# Altium PCB MiniDisplay.PcbDoc (part 2 of 2)
Units mil, origin at the board's own origin, x right, y up, seen from the top; angles counter-clockwise.
Board outline 1690.11 x 1520.11 mil, 2 copper layers (Top1, Bottom2), stack 12.8 mil thick; 78 components, 93 nets, 423 pads, 283 vias.
Unrouted connection lines stored in the file: 98.
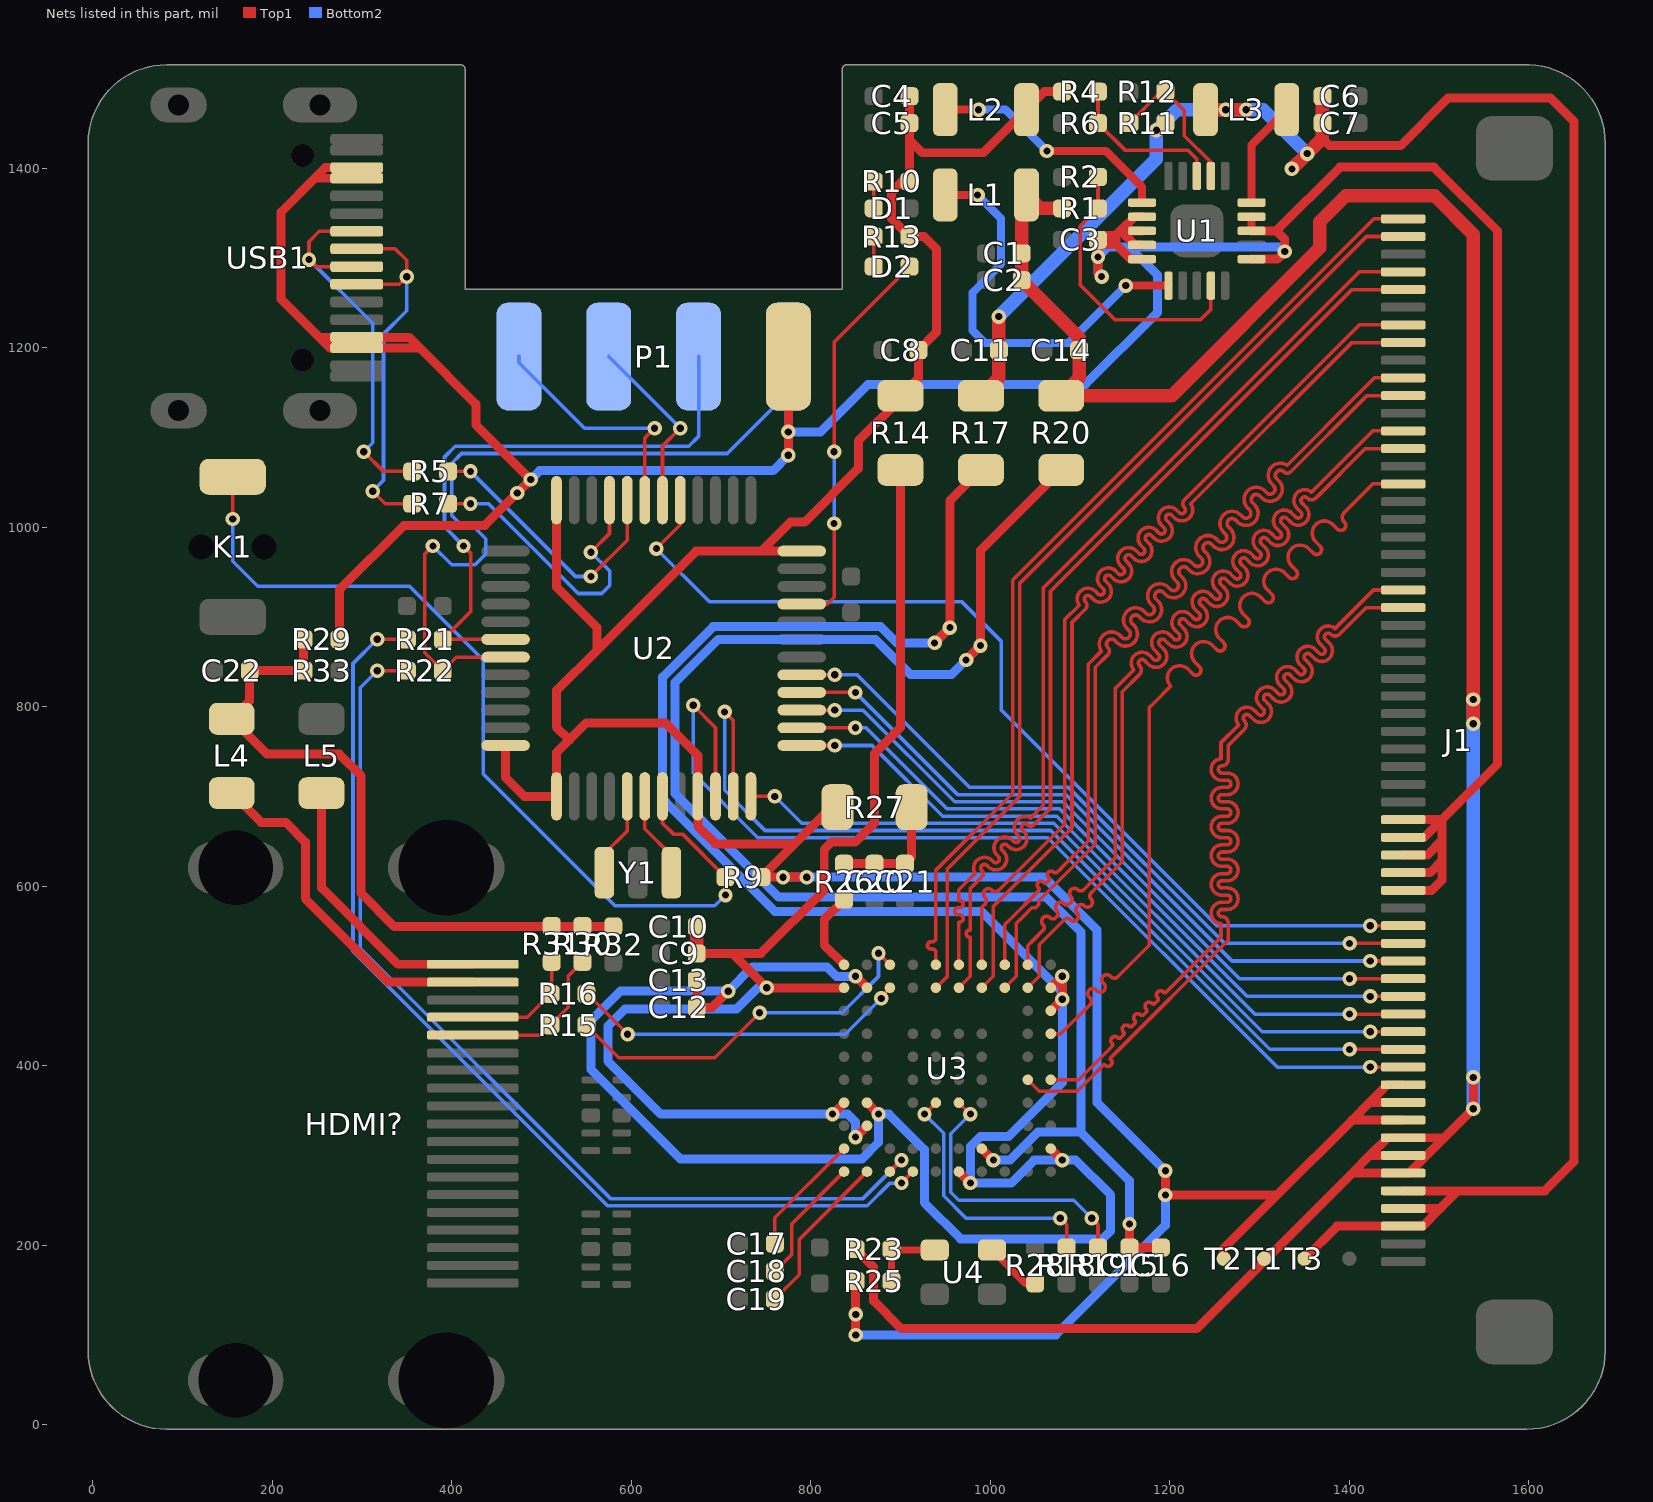
[diagram p2: the nets of this part, all layers, seen from the top]

## Via types
v1: diameter 16, hole 8, Top1 to Bottom2, tented both sides, 283 vias

## Nets (pads, with @x,y where several pads share a name; then routed paths per layer and width w, separated by ;. In a path a pad name is that pad's centre, name@x,y a point inside that pad or via, vN(x,y) a via of type N, cw(c..) or ccw(c..) an arc to the next point about the centre after c; other vN are vias at no path point) (continued)
MIPI0_D3_P: J1.45 U3.D10 | length 1077.2
  Top1 w4: U3.D10@1067.36,435.59 1078.59,435.59 1111,468 ccw(c1107.11,471.89) 1111,475.78 1110.29,476.49 cw(c1114.18,480.37) 1110.29,484.26 cw(c1114.18,480.37) 1118.07,484.26 1118.78,483.56 ccw(c1122.67,487.45) 1126.56,483.56 ccw(c1122.67,487.45) 1126.56,491.33 1125.85,492.04 cw(c1129.74,495.93) 1125.85,499.82 cw(c1129.74,495.93) 1133.63,499.82 1134.33,499.11 ccw(c1138.22,503) 1142.11,499.11 1146,503 1152.5,509.5 1177,534 1177,799 1181.34,803.34 1200.9,822.9 cw(c1210.79,832.08) 1220.33,841.63 1225.28,836.68 ccw(c1229.17,840.57) 1233.05,836.66 ; 1233.06,836.68 ccw(c1229.17,840.57) 1234.67,840.57 ccw(c1229.17,840.57) 1233.06,844.46 1228.11,849.41 cw(c1237.66,858.95) 1247.2,868.5 1252.15,863.55 ccw(c1256.04,867.44) 1259.92,863.53 ; 1259.93,863.55 ccw(c1256.04,867.44) 1261.54,867.44 ccw(c1256.04,867.44) 1259.93,871.33 1254.98,876.28 cw(c1264.53,885.82) 1274.07,895.37 1279.02,890.42 ccw(c1282.91,894.31) 1286.79,890.4 ; 1286.8,890.42 ccw(c1282.91,894.31) 1288.41,894.31 ccw(c1282.91,894.31) 1286.8,898.2 1281.85,903.15 cw(c1291.4,912.69) 1300.94,922.24 1305.89,917.29 ccw(c1309.78,921.18) 1313.66,917.27 ccw(c1309.78,921.18) 1315.28,921.18 ccw(c1309.78,921.18) 1313.67,925.07 1308.72,930.02 cw(c1318.27,939.56) 1327.81,949.11 1332.76,944.16 ccw(c1336.65,948.05) 1340.53,944.14 ; 1340.54,944.16 ccw(c1336.65,948.05) 1342.15,948.05 ccw(c1336.65,948.05) 1340.54,951.94 1335.59,956.89 cw(c1345.14,966.43) 1354.68,975.98 1359.63,971.03 ccw(c1363.52,974.92) 1367.4,971.01 ; 1367.41,971.03 ccw(c1363.52,974.92) 1369.02,974.92 ccw(c1363.52,974.92) 1367.41,978.81 1362.46,983.76 cw(c1372.01,993.3) 1381.55,1002.85 1386.5,997.9 ccw(c1390.39,1001.79) 1394.27,997.88 ; 1394.28,997.9 ccw(c1390.39,1001.79) 1395.89,1001.79 ccw(c1390.39,1001.79) 1394.28,1005.68 cw(c1399.59,1010.98) 1394.28,1016.28 1412.04,1034.04 1426.07,1048.07 J1.45@1460,1048.07
MIPI0_DC_N: J1.38 U3.F9 | length 1078.1
  Top1 w4: U3.F9@1041.77,384.41 1054.57,371.61 1096.93,371.61 1117.31,392 1120.5,395.18 1125.8,400.49 cw(c1126.86,399.42) 1127.92,400.49 ccw(c1131.1,403.67) 1134.28,400.49 ccw(c1131.1,403.67) 1134.28,406.85 cw(c1135.35,407.91) 1134.28,408.97 1136.66,411.34 1265,539.69 1265,559 ccw(c1258,559) 1258,566 cw(c1258,570) 1258,574 1264,574 ccw(c1264,586) 1276,586 ccw(c1264,586) 1264,598 1258,598 cw(c1258,602) 1258,606 1264,606 ccw(c1264,618) 1276,618 ccw(c1264,618) 1264,630 1258,630 cw(c1258,634) 1258,638 1264,638 ccw(c1264,650) 1276,650 ccw(c1264,650) 1264,662 1258,662 cw(c1258,666) 1258,670 1264,670 ccw(c1264,682) 1276,682 ccw(c1264,682) 1264,694 1258,694 cw(c1258,698) 1258,702 1264,702 ccw(c1264,714) 1276,714 ccw(c1264,714) 1264,726 1258,726 cw(c1258,730) 1258,734 ccw(c1258,741) 1265,741 1265,756.69 1282.92,774.61 ccw(c1277.97,779.56) 1284.97,779.56 ccw(c1277.97,779.56) 1282.92,784.51 cw(c1285.75,787.33) 1288.58,790.16 1292.82,785.92 ccw(c1301.3,794.41) 1313.3,794.41 ccw(c1301.3,794.41) 1309.79,802.89 1305.55,807.13 cw(c1308.38,809.96) 1311.2,812.79 1315.45,808.55 ccw(c1323.93,817.03) 1335.93,817.03 ccw(c1323.93,817.03) 1332.42,825.52 1328.17,829.76 cw(c1331,832.59) 1333.83,835.42 1338.07,831.18 ccw(c1346.56,839.66) 1358.56,839.66 ccw(c1346.56,839.66) 1355.05,848.15 1350.8,852.39 cw(c1353.63,855.22) 1356.46,858.05 1360.7,853.8 ccw(c1369.19,862.29) 1381.19,862.29 ccw(c1369.19,862.29) 1377.67,870.77 1373.43,875.02 cw(c1376.26,877.84) 1379.09,880.67 ccw(c1384.04,885.62) 1388.99,880.67 1418.59,910.28 J1.38@1460,910.28
MIPI0_DC_P: J1.39 U3.F10 | length 1080.8
  Top1 w4: U3.F10@1067.36,384.41 1098.41,384.41 1134,420 1135.52,421.52 ccw(c1133.86,423.18) 1135.52,424.84 ; 1135.52,424.84 cw(c1138.7,428.03) 1135.52,431.21 cw(c1138.7,428.03) 1141.88,431.21 ccw(c1143.55,432.87) 1145.21,431.21 1148.25,434.25 ccw(c1146.59,435.91) 1148.25,437.57 cw(c1151.43,440.75) 1148.25,443.94 cw(c1151.43,440.75) 1154.61,443.94 ccw(c1156.27,445.6) 1157.94,443.94 1160.98,446.98 ccw(c1159.31,448.64) 1160.98,450.3 cw(c1164.16,453.48) 1160.98,456.66 cw(c1164.16,453.48) 1167.34,456.66 ccw(c1169,458.33) 1170.66,456.66 1173.7,459.7 ccw(c1172.04,461.37) 1173.7,463.03 cw(c1176.89,466.21) 1173.7,469.39 cw(c1176.89,466.21) 1180.07,469.39 ccw(c1181.73,471.05) 1183.39,469.39 1186.43,472.43 ccw(c1184.77,474.09) 1186.43,475.76 cw(c1189.61,478.94) 1186.43,482.12 cw(c1189.61,478.94) 1192.8,482.12 ccw(c1194.46,483.78) 1196.12,482.12 1199.5,485.5 1257,543 1257,558.04 cw(c1258,570) 1258,582 1264,582 ccw(c1264,586) 1268,586 ccw(c1264,586) 1264,590 1258,590 cw(c1258,602) 1258,614 1264,614 ccw(c1264,618) 1268,618 ccw(c1264,618) 1264,622 1258,622 cw(c1258,634) 1258,646 1264,646 ccw(c1264,650) 1268,650 ccw(c1264,650) 1264,654 1258,654 cw(c1258,666) 1258,678 1264,678 ccw(c1264,682) 1268,682 ccw(c1264,682) 1264,686 1258,686 cw(c1258,698) 1258,710 1264,710 ccw(c1264,714) 1268,714 ccw(c1264,714) 1264,718 1258,718 cw(c1258,730) 1257,741.96 1257,760 1276.59,779.59 cw(c1285.75,787.33) 1294.23,795.82 1298.48,791.58 ccw(c1301.3,794.41) 1305.3,794.41 ccw(c1301.3,794.41) 1304.13,797.23 1299.89,801.48 cw(c1308.38,809.96) 1316.86,818.45 1321.1,814.2 ccw(c1323.93,817.03) 1327.93,817.03 ccw(c1323.93,817.03) 1326.77,819.85 1322.52,824.1 cw(c1331,832.59) 1339.49,841.07 1343.73,836.83 ccw(c1346.56,839.66) 1350.56,839.66 ccw(c1346.56,839.66) 1349.39,842.49 1345.15,846.73 cw(c1353.63,855.22) 1362.12,863.7 1366.36,859.46 ccw(c1369.19,862.29) 1373.19,862.29 ccw(c1369.19,862.29) 1372.02,865.12 1367.77,869.36 cw(c1376.26,877.84) 1384.01,887.01 1426.96,929.96 J1.39@1460,929.96
MIPI1_D0_N: J1.47 U3.B9 | length 1076.2
  Top1 w4: U3.B9@1041.77,486.77 1054.57,499.57 1054.57,512.36 1054.57,534.76 1074,554.2 1077.89,558.09 1082.49,562.68 cw(c1085.67,559.5) 1088.85,562.68 ccw(c1092.74,566.57) 1096.63,562.68 ccw(c1092.74,566.57) 1096.63,570.46 cw(c1099.81,573.64) 1096.63,576.82 1098.04,578.24 cw(c1101.22,575.06) 1104.41,578.24 ccw(c1108.29,582.13) 1112.18,578.24 ccw(c1108.29,582.13) 1112.18,586.02 cw(c1115.37,589.2) 1112.18,592.38 1116.78,596.98 1118.4,598.6 1147,627.2 1147,816.69 1166.19,835.88 ccw(c1161.24,840.83) 1168.24,840.83 ccw(c1161.24,840.83) 1166.19,845.78 cw(c1169.02,848.61) 1171.85,851.44 1176.09,847.19 ccw(c1184.58,855.68) 1196.58,855.68 ccw(c1184.58,855.68) 1193.06,864.16 1188.82,868.41 cw(c1191.65,871.23) 1194.48,874.06 1198.72,869.82 ccw(c1207.2,878.31) 1219.2,878.31 ccw(c1207.2,878.31) 1215.69,886.79 1211.45,891.03 cw(c1214.28,893.86) 1217.1,896.69 1221.35,892.45 ccw(c1229.83,900.93) 1241.83,900.93 ccw(c1229.83,900.93) 1238.32,909.42 1234.07,913.66 cw(c1236.9,916.49) 1239.73,919.32 1243.97,915.07 ccw(c1252.46,923.56) 1264.46,923.56 ccw(c1252.46,923.56) 1260.94,932.05 1256.7,936.29 cw(c1259.53,939.12) 1262.36,941.94 1266.6,937.7 ccw(c1275.09,946.19) 1287.09,946.19 ccw(c1275.09,946.19) 1283.57,954.67 1279.33,958.92 cw(c1282.16,961.74) 1284.99,964.57 1289.23,960.33 ccw(c1297.71,968.81) 1309.71,968.81 ccw(c1297.71,968.81) 1306.2,977.3 1301.96,981.54 cw(c1304.79,984.37) 1307.61,987.2 1311.86,982.96 ccw(c1320.34,991.44) 1332.34,991.44 ccw(c1320.34,991.44) 1328.83,999.93 1324.58,1004.17 cw(c1327.41,1007) 1330.24,1009.83 1334.48,1005.58 ccw(c1342.97,1014.07) 1354.97,1014.07 ccw(c1342.97,1014.07) 1351.45,1022.55 1347.21,1026.8 cw(c1350.04,1029.63) 1352.87,1032.45 ccw(c1357.82,1037.4) 1362.77,1032.45 1417.75,1087.44 J1.47@1460,1087.44
MIPI1_D0_P: J1.48 U3.A9 | length 1076
  Top1 w4: U3.A9@1041.77,512.36 1041.77,533.77 1048.67,540.67 1058,550 1058.71,550.71 ccw(c1055.53,553.89) 1058.71,557.07 cw(c1062.6,560.96) 1058.71,564.85 cw(c1062.6,560.96) 1066.49,564.85 ccw(c1069.67,568.03) 1072.85,564.85 1074.26,566.26 ccw(c1071.08,569.45) 1074.26,572.63 cw(c1078.15,576.52) 1074.26,580.41 cw(c1078.15,576.52) 1082.04,580.41 ccw(c1085.22,583.59) 1088.41,580.41 1089.82,581.82 ccw(c1086.64,585) 1089.82,588.18 cw(c1093.71,592.07) 1089.82,595.96 cw(c1093.71,592.07) 1097.6,595.96 ccw(c1100.78,599.14) 1103.96,595.96 1108.56,600.56 1110,602 1139,631 1139,820 1159.86,840.86 cw(c1169.02,848.61) 1177.51,857.09 1181.75,852.85 ccw(c1184.58,855.68) 1188.58,855.68 ccw(c1184.58,855.68) 1187.41,858.51 1183.16,862.75 cw(c1191.65,871.23) 1200.13,879.72 1204.38,875.48 ccw(c1207.2,878.31) 1211.2,878.31 ccw(c1207.2,878.31) 1210.03,881.13 1205.79,885.38 cw(c1214.28,893.86) 1222.76,902.35 1227,898.1 ccw(c1229.83,900.93) 1233.83,900.93 ccw(c1229.83,900.93) 1232.66,903.76 1228.42,908 cw(c1236.9,916.49) 1245.39,924.97 1249.63,920.73 ccw(c1252.46,923.56) 1256.46,923.56 ccw(c1252.46,923.56) 1255.29,926.39 1251.05,930.63 cw(c1259.53,939.12) 1268.02,947.6 1272.26,943.36 ccw(c1275.09,946.19) 1279.09,946.19 ccw(c1275.09,946.19) 1277.92,949.02 1273.67,953.26 cw(c1282.16,961.74) 1290.64,970.23 1294.89,965.99 ccw(c1297.71,968.81) 1301.71,968.81 ccw(c1297.71,968.81) 1300.54,971.64 1296.3,975.89 cw(c1304.79,984.37) 1313.27,992.86 1317.51,988.61 ccw(c1320.34,991.44) 1324.34,991.44 ccw(c1320.34,991.44) 1323.17,994.27 1318.93,998.51 cw(c1327.41,1007) 1335.9,1015.48 1340.14,1011.24 ccw(c1342.97,1014.07) 1346.97,1014.07 ccw(c1342.97,1014.07) 1345.8,1016.9 1341.55,1021.14 cw(c1350.04,1029.63) 1357.79,1038.79 1412.1,1093.1 1426.13,1107.12 J1.48@1460,1107.12
MIPI1_D1_N: J1.50 U3.B8 | length 1076
  Top1 w4: U3.B8@1016.18,486.77 1028.98,499.57 1028.98,512.36 1028.98,558.66 1034.66,564.34 1038.55,568.23 1046.32,576.01 1050.57,576.01 1054.1,579.55 1054.1,583.79 1061.88,591.57 1068,597.69 1117,646.69 1117,843.95 1131.05,858.01 ; 1131.05,858 ccw(c1127.16,861.89) 1132.66,861.89 ccw(c1127.16,861.89) 1131.05,865.78 cw(c1134.94,869.67) 1131.03,873.54 ; 1131.05,873.56 cw(c1134.94,869.67) 1138.82,873.56 1140.95,871.43 ccw(c1150.49,880.98) 1163.99,880.98 ccw(c1150.49,880.98) 1160.04,890.53 1157.92,892.65 cw(c1161.81,896.54) 1157.9,900.41 ; 1157.92,900.43 cw(c1161.81,896.54) 1165.69,900.43 1167.82,898.31 ccw(c1177.36,907.85) 1190.86,907.85 ccw(c1177.36,907.85) 1186.91,917.4 1184.79,919.52 cw(c1188.68,923.41) 1184.77,927.28 ; 1184.79,927.3 cw(c1188.68,923.41) 1192.56,927.3 1194.69,925.18 ccw(c1204.23,934.72) 1217.73,934.72 ccw(c1204.23,934.72) 1213.78,944.27 1211.66,946.39 cw(c1215.55,950.28) 1211.64,954.15 ; 1211.66,954.17 cw(c1215.55,950.28) 1219.43,954.17 1221.56,952.05 ccw(c1231.1,961.59) 1244.6,961.59 ccw(c1231.1,961.59) 1240.65,971.14 1238.53,973.26 cw(c1242.42,977.15) 1238.51,981.02 cw(c1242.42,977.15) 1246.3,981.04 1248.43,978.92 ccw(c1257.97,988.46) 1271.47,988.46 ccw(c1257.97,988.46) 1267.52,998.01 1265.4,1000.13 cw(c1269.29,1004.02) 1265.38,1007.89 ; 1265.4,1007.91 cw(c1269.29,1004.02) 1273.17,1007.91 1275.3,1005.79 ccw(c1284.84,1015.33) 1298.34,1015.33 ccw(c1284.84,1015.33) 1294.39,1024.88 1292.27,1027 cw(c1296.16,1030.89) 1292.25,1034.76 ; 1292.27,1034.78 cw(c1296.16,1030.89) 1300.04,1034.78 1302.17,1032.66 ccw(c1311.71,1042.2) 1325.21,1042.2 ccw(c1311.71,1042.2) 1321.26,1051.75 1319.14,1053.87 cw(c1323.03,1057.76) 1319.12,1061.63 ; 1319.14,1061.65 cw(c1323.03,1057.76) 1326.91,1061.65 ccw(c1330.8,1065.54) 1334.69,1061.65 1419.54,1146.49 J1.50@1460,1146.49
MIPI1_D1_P: J1.51 U3.A8 | length 1077
  Top1 w4: U3.A8@1016.18,512.36 1016.18,557.18 1023.32,564.32 1052,593 1053.42,594.42 ccw(c1051.3,596.54) 1053.42,598.67 cw(c1056.25,601.49) 1053.42,604.32 cw(c1056.25,601.49) 1059.08,604.32 ccw(c1061.2,606.44) 1063.32,604.32 1064.74,605.74 ccw(c1062.62,607.86) 1064.74,609.98 cw(c1067.57,612.81) 1064.74,615.64 cw(c1067.57,612.81) 1070.39,615.64 ccw(c1072.51,617.76) 1074.64,615.64 1078.17,619.17 1081,622 1109,650 1109,847.27 1123.79,862.05 cw(c1134.94,869.67) 1144.48,879.21 1146.6,877.09 ccw(c1150.49,880.98) 1154.37,877.08 ccw(c1150.49,880.98) 1155.99,880.98 ccw(c1150.49,880.98) 1154.38,884.87 1152.26,886.99 cw(c1161.81,896.54) 1171.35,906.08 1173.47,903.96 ccw(c1177.36,907.85) 1181.24,903.95 ccw(c1177.36,907.85) 1182.86,907.85 ccw(c1177.36,907.85) 1181.25,911.74 1179.13,913.86 cw(c1188.68,923.41) 1198.22,932.95 1200.34,930.83 ccw(c1204.23,934.72) 1208.11,930.82 ccw(c1204.23,934.72) 1209.73,934.72 ccw(c1204.23,934.72) 1208.12,938.61 1206,940.73 cw(c1215.55,950.28) 1225.09,959.82 1227.21,957.7 ccw(c1231.1,961.59) 1234.98,957.69 ; 1234.99,957.7 ccw(c1231.1,961.59) 1236.6,961.59 ccw(c1231.1,961.59) 1234.99,965.48 1232.87,967.6 cw(c1242.42,977.15) 1251.96,986.69 1254.08,984.57 ccw(c1257.97,988.46) 1261.85,984.56 ; 1261.86,984.57 ccw(c1257.97,988.46) 1263.47,988.46 ccw(c1257.97,988.46) 1261.86,992.35 1259.74,994.47 cw(c1269.29,1004.02) 1278.83,1013.56 1280.95,1011.44 ccw(c1284.84,1015.33) 1288.72,1011.43 ccw(c1284.84,1015.33) 1290.34,1015.33 ccw(c1284.84,1015.33) 1288.73,1019.22 1286.61,1021.34 cw(c1296.16,1030.89) 1305.7,1040.43 1307.82,1038.31 ccw(c1311.71,1042.2) 1315.59,1038.3 ccw(c1311.71,1042.2) 1317.21,1042.2 ccw(c1311.71,1042.2) 1315.6,1046.09 1313.48,1048.21 cw(c1323.03,1057.76) 1330.64,1068.91 1413.88,1152.15 1427.91,1166.18 J1.51@1460,1166.18
MIPI1_D2_N: J1.56 U3.B6 | length 1819.6
  Top1 w4: U3.B6@965,486.77 977.8,499.57 977.8,512.36 977.8,539 977.8,542.2 ccw(c977,542.2) 977,543 cw(c977,547) 973,547 cw(c977,547) 977,551 ccw(c977,551.8) 977.8,551.8 977.8,556 977.8,597.48 990.61,610.29 ccw(c987.07,613.83) 992.07,613.83 ccw(c987.07,613.83) 990.61,617.36 cw(c993.43,620.19) 990.59,623.01 ; 990.61,623.02 cw(c993.43,620.19) 996.26,623.02 997.68,621.61 ccw(c1006.16,630.09) 1018.16,630.09 ccw(c1006.16,630.09) 1014.65,638.58 1013.23,639.99 cw(c1016.06,642.82) 1013.22,645.63 ; 1013.23,645.65 cw(c1016.06,642.82) 1018.89,645.65 1020.3,644.23 ccw(c1028.79,652.72) 1040.79,652.72 ccw(c1028.79,652.72) 1037.27,661.2 1035.86,662.62 cw(c1038.69,665.45) 1035.85,668.26 ; 1035.86,668.27 cw(c1038.69,665.45) 1041.52,668.27 ccw(c1045.05,671.81) 1048.59,668.27 ; J1.56@1460,1264.61 1402.97,1264.61 ; 1048.59,668.27 1067,686.69 ; 1048.59,668.27 1067,686.69 ; 1067,686.69 1067,699 ; 1067,686.69 1067,699 ; 1067,699 1067,928.64 ; 1067,699 1067,719 1067,928.64 ; 1067,928.64 1402.97,1264.61 ; 1067,928.64 1402.97,1264.61
MIPI1_D2_P: J1.57 U3.A6 | length 1814.1
  Top1 w4: U3.A6@965,512.36 965,555 965,559.2 cw(c965.8,559.2) 965.8,560 ccw(c965.8,564) 969.8,564 ccw(c965.8,564) 965.8,568 965,568 964.2,568 cw(c964.2,572) 960.2,572 cw(c964.2,572) 964.2,576 965,576 965.8,576 ccw(c965.8,580) 969.8,580 ccw(c965.8,580) 965.8,584 cw(c965.8,584.8) 965,584.8 965,588 965,596 972.14,603.14 983.1,614.1 cw(c993.43,620.19) 1001.92,628.68 1003.33,627.26 ccw(c1006.16,630.09) 1008.98,627.25 ccw(c1006.16,630.09) 1010.16,630.09 ccw(c1006.16,630.09) 1008.99,632.92 1007.58,634.33 cw(c1016.06,642.82) 1024.55,651.3 1025.96,649.89 ccw(c1028.79,652.72) 1031.6,649.88 ccw(c1028.79,652.72) 1032.79,652.72 ccw(c1028.79,652.72) 1031.62,655.55 1030.2,656.96 cw(c1038.69,665.45) 1044.78,675.78 ; 1397.23,1270.34 1059,932.1 ; J1.57@1460,1284.29 1411.19,1284.29 1059,932.1 ; 1044.78,675.78 1059,690 ; 1044.78,675.78 1059,690 ; 1059,690 1059,699 ; 1059,690 1059,699 ; 1059,699 1059,719 ; 1059,699 1059,719 ; 1059,719 1059,721.69 ; 1059,721.69 1059,932.1 ; 1059,721.69 1059,932.1
MIPI1_D3_N: J1.59 U3.B5 | length 1076.6
  Top1 w4: U3.B5@939.41,486.77 952.21,499.57 952.21,619.49 1033,700.28 1033,937.69 1418.97,1323.66 J1.59@1460,1323.66
MIPI1_D3_P: J1.60 U3.A5 | length 1077.7
  Top1 w4: U3.A5@939.41,512.36 939.41,526 ccw(c935.41,526) 935.41,530 934,530 cw(c934,534) 930,534 cw(c934,534) 934,538 935.41,538 ccw(c935.41,542) 939.41,542 939.41,544.5 939.41,618.01 1025,703.6 1025,941 1427.35,1343.35 J1.60@1460,1343.35
MIPI1_DC_N: J1.53 U3.B7 | length 1075.6
  Top1 w4: U3.B7@990.59,486.77 1003.39,499.57 1003.39,577.39 1091,665 1091,893.69 1105.9,908.59 ccw(c1101.66,912.83) 1107.66,912.83 ccw(c1101.66,912.83) 1105.9,917.07 cw(c1108.73,919.9) 1111.56,922.73 1114.38,919.9 ccw(c1122.87,928.38) 1134.87,928.38 ccw(c1122.87,928.38) 1131.36,936.87 1128.53,939.7 cw(c1131.36,942.53) 1134.18,945.36 1137.01,942.53 ccw(c1145.5,951.01) 1157.5,951.01 ccw(c1145.5,951.01) 1153.98,959.5 1151.15,962.33 ; 1151.14,962.34 cw(c1153.98,965.15) 1156.81,967.98 1159.64,965.15 ccw(c1168.12,973.64) 1180.12,973.64 ccw(c1168.12,973.64) 1176.61,982.12 1173.78,984.95 cw(c1176.61,987.78) 1179.44,990.61 1182.27,987.78 ccw(c1190.75,996.27) 1202.75,996.27 ccw(c1190.75,996.27) 1199.24,1004.75 1196.41,1007.58 cw(c1199.24,1010.41) 1202.07,1013.24 1204.89,1010.41 ccw(c1213.38,1018.89) 1225.38,1018.89 ccw(c1213.38,1018.89) 1223.16,1025.85 1402.86,1205.55 J1.53@1460,1205.55
MIPI1_DC_P: J1.54 U3.A7 | length 1077.3
  Top1 w4: U3.A7@990.59,512.36 990.59,576.59 994,580 ccw(c990.11,583.89) 994,587.78 cw(c997.89,591.67) 994,595.56 cw(c997.89,591.67) 1001.78,595.56 ccw(c1005.67,599.45) 1009.56,595.56 1013.45,599.45 1020,606 1083,669 1083,897 1098.95,912.95 cw(c1108.73,919.9) 1117.21,928.38 1120.04,925.56 ccw(c1122.87,928.38) 1126.87,928.38 ccw(c1122.87,928.38) 1125.7,931.21 1122.87,934.04 cw(c1131.36,942.53) 1139.84,951.01 1142.67,948.18 ccw(c1145.5,951.01) 1149.5,951.01 ccw(c1145.5,951.01) 1148.33,953.84 1145.5,956.67 cw(c1153.98,965.15) 1162.47,973.64 1165.3,970.81 ccw(c1168.12,973.64) 1172.12,973.64 ccw(c1168.12,973.64) 1170.97,976.45 1168.12,979.3 cw(c1176.61,987.78) 1185.1,996.27 1187.92,993.44 ccw(c1190.75,996.27) 1194.75,996.27 ccw(c1190.75,996.27) 1193.58,999.1 1190.75,1001.92 cw(c1199.24,1010.41) 1207.72,1018.89 1210.55,1016.07 ccw(c1213.38,1018.89) 1217.38,1018.89 ccw(c1213.38,1018.89) 1216.21,1021.72 cw(c1220.45,1025.97) 1216.21,1030.21 1411.23,1225.23 J1.54@1460,1225.23
NetC9_2: C9.2 C10.2 R14.1 U3.B1 U3.G1 U3.H2 | length 1450.8
  Top1 w10: C9.2@673,525 712.63,525 ; v1(824.25,346.02) U3.G1@837.05,358.82 ; U3.B1@837.05,486.77 v1(750.86,486.77) 712.63,525 ; v1(849.84,320.43) U3.H2@862.64,333.23 ; R14.1@900,1063.66 900,777 871,748 871,670.5 849.5,649 823,649 815,641 815,595.5 744.5,525 712.63,525
  Top1 w15: C9.2@673,525 C10.2@673,555
  Bottom2 w10: v1(750.86,486.77) 740.77,486.77 717,463 593,463 574,444 574,405 632.98,346.02 v1(824.25,346.02) 840.98,346.02 849.84,337.16 v1(849.84,320.43)
NetC12_2: C12.2 C13.2 R17.1 U3.B2 U3.B10 U3.C10 U3.G2 U3.J10 U3.K6 | length 3095.8
  Top1 w10: C13.2@673,495 C12.2@673,465 690,465 v1(708,483) ; v1(849.84,499.57) U3.B2@862.64,486.77 ; U3.G2@862.64,358.82 v1(875.43,346.02) ; v1(938,871) v1(955,888) 955,1029.16 R17.1@989.5,1063.66 ; U3.K6@965,282.05 v1(977.8,269.25) ; U3.J10@1067.36,307.64 v1(1080.16,294.84) ; U3.C10@1067.36,461.18 v1(1080.16,473.98) v1(1080.16,499.57) U3.B10@1067.36,486.77
  Bottom2 w10: v1(849.84,499.57) 828.43,499.57 818,510 735,510 v1(708,483) 588,483 555,450 555,396 655,296 857,296 875.43,314.43 v1(875.43,346.02) 886.98,346.02 926.61,306.39 926.61,247.39 967,207 1125,207 1134,216 1134,256 1095.16,294.84 v1(1080.16,294.84) 1048.84,294.84 1023.25,269.25 v1(977.8,269.25) 977.8,309.8 989,321 1020,321 1080.16,381.16 v1(1080.16,473.98) v1@1080.16,481.84 ; v1(955,888) v1(938,871) 895.8,871 877.8,889 691.2,889 635,832.8 635,697.2 640,692.2 640,692 760,572 990,572 v1@1080.16,481.84 ; v1(1080.16,499.57) v1@1080.16,481.84
NetC15_2: C15.2 C16.2 R20.1 U3.J7 | length 1822.1
  Top1 w10: v1(973,852) v1(989,868) 989,973.66 R20.1@1079,1063.66 ; U3.J7@990.59,307.64 v1(1003.39,294.84) ; v1(1155,223.59) C15.2@1155,197.52 C16.2@1190,197.52
  Bottom2 w10: v1(989,868) v1(973,852) 957,836 911,836 872,875 697,875 649,827 649,703 764,588 1062,588 1101,549 1101,326 ; v1(1003.39,294.84) 1021.84,294.84 1053,326 1101,326 ; v1(1155,223.59) 1155,272 1101,326
NetC17_1: C17.1 U3.J1 | length 137.9
  Top1 w4: C17.1@760,201.61 760,230.59 U3.J1@837.05,307.64
NetC18_1: C18.1 U3.K1 | length 143.2
  Top1 w4: C18.1@760,170.81 779,189.81 779,224 U3.K1@837.05,282.05
NetC19_1: C19.1 U3.K2 | length 184.6
  Top1 w4: C19.1@760,140 787,167 787,206.41 U3.K2@862.64,282.05
NetC20_2: C20.2 C21.2 R26.2 R27.1 | length 126
  Top1 w10: R26.2@837.05,625 C20.2@871.02,625 C21.2@905,625 912.36,632.36 R27.1@912.36,680
NetD1_1: D1.1 R10.2 | length 30
  Top1 w4: D1.1@870,1355 R10.2@870,1385
NetD2_1: D2.1 R13.2 | length 33.5
  Top1 w4: D2.1@870,1290.16 R13.2@870,1323.66
NetHDMI?_18: HDMI?.18 L4.2 | length 392.7
  Top1 w10: L4.2@155,703.66 187.66,671 215,671 237,649 237,586 330,493 HDMI?.18@423.5,493
NetHDMI?_19: HDMI?.19 L5.2 | length 309.4
  Top1 w10: L5.2@255,703.66 255,598 340,513 HDMI?.19@423.5,513
NetK1_1: K1.1 R9.1 U2.7 | length 1026.3
  Top1 w4: v1(156,1009) K1.1@156,1056 ; U2.7@634.84,700 634.84,670.16 647,658 657,658 R9.1@705,610 v1(705,590)
  Bottom2 w4: v1(156,1009) 156,962 184,934 353,934 435,852 435,725 582,578 693,578 v1(705,590)
NetL1_1: L1.1 U1.11 | length 462
  Top1 w9: L1.1@949.72,1370 v1(985.9,1370) ; v1(1150.98,1268.98) U1.11@1198.5,1268.98
  Bottom2 w9: v1(985.9,1370) 1012,1343.9 1012,1293 980,1261 980,1219 994,1205 1087,1205 v1(1150.98,1268.98)
NetL2_1: L2.1 U1.6 | length 272.3
  Top1 w9: L2.1@949.72,1465 v1(987,1465) ; v1(1063,1419) 1128.9,1419 1168.98,1378.92 U1.6@1168.98,1361.5
  Bottom2 w9: v1(987,1465) 1017,1465 v1(1063,1419)
NetL3_1: L3.1 U1.20 | length 119.8
  Top1 w9: U1.20@1291.02,1361.5 1291.02,1425.75 L3.1@1330.28,1465
NetR1_1: R1.1 R2.2 U1.14 | length 321.2
  Top1 w4: R2.2@1120,1390 R1.1@1120,1355 1100,1335 1100,1270 1138.9,1231.1 1234.1,1231.1 1245.75,1242.75 U1.14@1245.75,1268.98
NetR4_1: R4.1 R6.2 U1.3 | length 180.5
  Top1 w4: R4.1@1120,1485 R6.2@1120,1450 1150,1420 1220,1420 1230,1410 U1.3@1230,1391.02
NetR5_2: R5.2 U2.32 | length 309.2
  Top1 w4: R5.2@396,1062 v1(421,1062) ; v1(555,945) 595.47,985.47 U2.32@595.47,1030
  Bottom2 w4: v1(421,1062) 538,945 v1(555,945)
NetR7_2: R7.2 U2.33 | length 337.5
  Top1 w4: R7.2@396,1026 v1(421,1026) ; v1(555,972) 575.79,992.79 U2.33@575.79,1030
  Bottom2 w4: v1(421,1026) 441,1026 541,926 567,926 576,935 576,951 v1(555,972)
NetR11_1: R11.1 R12.2 U1.2 | length 169.5
  Top1 w4: R11.1@1155,1450 1190,1485 R12.2@1195,1485 1216,1464 1216,1436 1245.75,1406.25 U1.2@1245.75,1391.02
NetR15_2: R15.2 U3.A3 | length 421.6
  Top1 w4: R15.2@550,445 586,409 693,409 v1(743,459) ; v1(875.43,525.16) U3.A3@888.23,512.36
  Bottom2 w4: v1(743,459) 835,459 875.43,499.43 v1(875.43,525.16)
NetR16_2: R16.2 U3.B3 | length 381.7
  Top1 w4: R16.2@550,480 551,480 v1(596,435) ; v1@875.43,473.98 U3.B3@888.23,486.77
  Bottom2 w4: v1(596,435) 838.46,435 v1(878.43,474.98)
NetR18_2: R18.2 U3.G5 | length 293.7
  Top1 w4: v1(926.61,346.02) U3.G5@939.41,358.82 ; v1(1078,230) 1085,223 R18.2@1085,197.52
  Bottom2 w4: v1(926.61,346.02) 948,324.64 948,255 973,230 v1(1078,230)
NetR19_2: R19.2 U3.G6 | length 318.5
  Top1 w4: U3.G6@965,358.82 v1(977.8,346.02) ; v1(1113,230) 1120,223 R19.2@1120,197.52
  Bottom2 w4: v1(977.8,346.02) 956,324.23 956,259 965,250 1093,250 v1(1113,230)
NetR21_2: R21.2 U3.K4 | length 1148.7
  Top1 w4: v1(317,875) 349.84,875 R21.2@350,874.84 ; v1(901.02,269.25) U3.K4@913.82,282.05
  Bottom2 w4: v1(317,875) 290,848 290,527.63 573.63,244 863,244 888.25,269.25 v1(901.02,269.25)
NetR22_2: R22.2 U3.K3 | length 1104.3
  Top1 w4: v1(317,840) R22.2@350,840 ; U3.K3@888.23,282.05 v1(901.02,294.84)
  Bottom2 w4: v1(317,840) 298,821 298,530.94 576.94,252 858.18,252 v1(901.02,294.84)
NetR23_1: R23.1 R25.1 U4.4 | length 84.2
  Top1 w8: R25.1@890,160 R23.1@890,195.63 891.02,194.61 U4.4@938.11,194.61
NetR26_1: R26.1 U3.A1 | length 90.9
  Top1 w10: U3.A1@837.05,512.36 815,534.41 815,562.95 R26.1@837.05,585
NetR28_1: R28.1 U4.3 | length 63.5
  Top1 w8: U4.3@1001.89,194.61 1038.98,157.52 R28.1@1050,157.52
NetU2_5: U2.5 Y1.3 | length 95.6
  Top1 w4: Y1.3@570,615 570,636 595.47,661.47 U2.5@595.47,700
NetU2_6: U2.6 Y1.1 | length 97.3
  Top1 w4: U2.6@615.16,700 615.16,663.84 644.8,634.2 Y1.1@644.8,615
PA0: J1.12 U2.10 | length 1113.9
  Top1 w4: v1(669,801.48) 693.9,776.58 U2.10@693.9,700 ; v1(1423.31,398.47) J1.12@1460,398.47
  Bottom2 w4: v1(669,801.48) 669,726 741,654 1064,654 1319.54,398.47 v1(1423.31,398.47)
PA1: J1.13 U2.11 | length 1060.8
  Top1 w4: v1(704,794.08) 713.58,784.5 U2.11@713.58,700 ; v1(1400.26,418.15) J1.13@1460,418.15
  Bottom2 w4: v1(704,794.08) 704,707 749,662 1067.31,662 1311.16,418.15 v1(1400.26,418.15)
PA2: J1.14 U2.12 | length 835.3
  Top1 w4: U2.12@733.27,700 v1(759.84,700) ; v1(1423.31,437.84) J1.14@1460,437.84
  Bottom2 w4: v1(759.84,700) 789.84,670 1070.63,670 1302.79,437.84 v1(1423.31,437.84)
PA3: J1.15 U2.13 | length 793.9
  Top1 w4: U2.13@790,756.73 v1(826.69,756.73) ; v1(1400.26,457.52) J1.15@1460,457.52
  Bottom2 w4: v1(826.69,756.73) 868.27,756.73 947,678 1073.94,678 1294.42,457.52 v1(1400.26,457.52)
PA4: J1.16 U2.14 | length 793.9
  Top1 w4: U2.14@790,776.42 v1(849.74,776.42) ; v1(1423.31,477.2) J1.16@1460,477.2
  Bottom2 w4: v1(849.74,776.42) 861.58,776.42 952,686 1077.25,686 1286.05,477.2 v1(1423.31,477.2)
PA5: J1.17 U2.15 | length 793.9
  Top1 w4: U2.15@790,796.1 v1(826.69,796.1) ; v1(1400.26,496.89) J1.17@1460,496.89
  Bottom2 w4: v1(826.69,796.1) 858.11,796.1 960.21,694 1080.57,694 1277.68,496.89 v1(1400.26,496.89)
PA6: J1.18 U2.16 | length 793.9
  Top1 w4: U2.16@790,815.79 v1(849.74,815.79) ; v1(1423.31,516.57) J1.18@1460,516.57
  Bottom2 w4: v1(849.74,815.79) 963.53,702 1083.88,702 1269.31,516.57 v1(1423.31,516.57)
PA7: J1.19 U2.17 | length 793.9
  Top1 w4: U2.17@790,835.47 v1(826.69,835.47) ; v1(1400.26,536.26) J1.19@1460,536.26
  Bottom2 w4: v1(826.69,835.47) 851.53,835.47 977,710 1087.2,710 1260.94,536.26 v1(1400.26,536.26)
PWM: J1.20 U2.29 | length 1115.8
  Top1 w4: v1(628,976) 654.53,1002.53 U2.29@654.53,1030 ; v1(1423.31,555.94) J1.20@1460,555.94
  Bottom2 w4: v1(628,976) 687,917 968,917 1012,873 1012,796.51 1252.56,555.94 v1(1423.31,555.94)
R_DDC_SCL: HDMI?.15 R15.1 R30.1 | length 176.5
  Top1 w4: HDMI?.15@423.5,434 499,434 R15.1@510,445 530,465 530,499.92 R30.1@545.71,515.63
R_DDC_SDA: HDMI?.16 R16.1 R31.1 | length 133.5
  Top1 w4: HDMI?.16@423.5,454 484,454 R16.1@510,480 511.42,481.42 R31.1@511.42,515.63
R_I2C_SCL: P1.6 R21.1 U2.42 | length 679.5
  Top1 w4: v1(413.21,979) 421,971.21 421,905.84 R21.1@390,874.84 U2.42@460,874.84
  Bottom2 w4: v1(413.21,979) 392,1000.21 392,1078 404,1090 664,1090 675,1101 P1.6@675,1190
R_I2C_SDA: P1.8 R22.1 U2.43 | length 871.5
  Top1 w4: v1(379,979) 370,970 370,860 R22.1@390,840 405.16,855.16 U2.43@460,855.16
  Bottom2 w4: v1(379,979) 400,958 426,958 438,970 438,987 422,1003 410,1003 400,1013 400,1071 411,1082 707,1082 775,1150 P1.8@775,1190
UART1-Rx: P1.2 U2.31 | length 272.7
  Top1 w4: U2.31@615.16,1030 615.16,1099.16 v1(626,1110)
  Bottom2 w4: P1.2@475,1190 475,1183 548,1110 v1(626,1110)
UART1-Tx: P1.4 U2.30 | length 201.1
  Top1 w4: U2.30@634.84,1030 634.84,1090.32 v1(654.53,1110)
  Bottom2 w4: P1.4@575,1190 654.53,1110.47 v1(654.53,1110)
USB_N: R5.1 USB1.A7 USB1.B7 | length 445.1
  Top1 w4: USB1.A7@294.21,1290.16 248.84,1290.16 v1(241,1298) 241,1318 252.53,1329.53 USB1.B7@294.21,1329.53 ; v1(302,1084) 324,1062 R5.1@356,1062
  Bottom2 w4: v1(241,1298) 312,1227 312,1094 v1(302,1084)
USB_P: R7.1 USB1.A6 USB1.B6 | length 442.6
  Top1 w4: USB1.B6@294.21,1270.47 341.47,1270.47 v1(349.84,1278.84) 349.84,1297.13 337.13,1309.84 USB1.A6@294.21,1309.84 ; v1(312,1040) 326,1026 R7.1@356,1026
  Bottom2 w4: v1(312,1040) 324,1052 324,1215 349.84,1240.84 v1(349.84,1278.84)
USR_LED: D2.2 U2.21 | length 442.2
  Top1 w4: U2.21@790,914.21 818.21,914.21 826,922 v1(826,1004) ; v1(826,1084) 826,1206.16 D2.2@910,1290.16
  Bottom2 w4: v1(826,1004) v1(826,1084)
VCC_1V1: C6.2 C7.1 C11.2 J1.3 J1.4 J1.5 L3.2 R11.2 R17.2 T3.0 | length 2674.3
  Top1 w10: T3.0@1350,185 1386.3,221.3 J1.3@1460,221.3 1481.63,221.3 1501.31,240.98 ; 1370,1433 1378,1425 1457,1425 1510,1478 1624,1478 1650,1452 1650,293 1617.67,260.67 1521,260.67 ; J1.4@1460,240.98 1501.31,240.98 ; J1.5@1460,260.67 1521,260.67 ; 1501.31,240.98 1521,260.67
  Top1 w15: R17.2@989.5,1146.34 1009.5,1166.34 C11.2@1009.5,1197.12 v1(1009.5,1234.5) ; v1(1185,1442) 1187,1442 R11.2@1195,1450 ; L3.2@1239.72,1465 v1(1262.36,1465) v1(1285,1465) ; v1(1336,1399) v1(1353,1416) 1370,1433 C7.1@1370,1450 C6.2@1370,1480
  Bottom2 w15: v1(1009.5,1234.5) 1185,1410 v1(1185,1442) 1208,1465 v1(1262.36,1465) v1(1285,1465) 1304,1465 v1(1353,1416) v1(1336,1399)
VCC_1V8: C1.2 C2.1 C14.2 J1.6 J1.7 J1.8 L1.2 R1.2 R20.2 R23.2 T1.0 | length 2958.8
  Top1 w10: R23.2@850,195.63 870,175.63 870,138.02 901.02,107 1229.84,107 1403.2,280.36 ; v1(1538,387) v1(1538,352) 1505.72,319.73 ; 1403.2,280.36 1422.88,300.04 ; 1403.2,280.36 J1.6@1460,280.36 1466.36,280.36 1486.04,300.04 ; 1422.88,300.04 1442.57,319.73 J1.8@1460,319.73 1505.72,319.73 ; 1422.88,300.04 J1.7@1460,300.04 1486.04,300.04 ; 1486.04,300.04 1505.72,319.73
  Top1 w15: R1.2@1080,1355 1055.28,1355 L1.2@1040.28,1370 1035,1364.72 C1.2@1035,1305 C2.1@1035,1275 1099,1211 C14.2@1099,1197.12 1099,1166.34 R20.2@1079,1146.34 1202.31,1146.34 1367,1311.03 1367,1340 1396,1369 1495,1369 1538,1326 v1(1538,808) v1(1538,781)
  Bottom2 w15: v1(1538,352) v1(1538,387) v1(1538,781) v1(1538,808)
VCC_3V3: C4.2 C5.1 C8.2 J1.9 J1.10 J1.11 L2.2 R4.2 R9.2 R10.1 R13.1 R14.2 R25.2 R27.2 T2.0 U2.1 U2.9 U2.24 U2.36 U2.48 | length 3869.6
  Top1 w10: U2.48@460,756.73 460,721 481,700 U2.1@516.73,700 516.73,748.73 531,763 ; U2.36@516.73,1030 516.73,933.27 562,888 562,863 ; U2.24@790,973.27 745,973.27 ; v1(795.44,610) v1(769,610) R9.2@745,610 782,647 ; R27.2@829.68,680 815,680 782,647 ; v1(850,100.05) v1(850,123) R25.2@850,160 ; C4.2@910,1480 C5.1@910,1450 910,1431 ; R4.2@1080,1485 1060.28,1485 L2.2@1040.28,1465 992.28,1417 924,1417 910,1431 ; v1(1195,283) v1(1195,256) 1319.59,256 ; T2.0@1260,185 1260,196.41 1319.59,256 ; J1.9@1460,339.41 1403,339.41 ; J1.10@1460,359.1 1422.69,359.1 ; J1.11@1460,378.78 1442.37,378.78 1422.69,359.1 ; 531,763 550,782 638,782 674.21,745.79 U2.9@674.21,700 674.21,666.84 694.06,647 782,647 ; 531,763 516.73,777.27 516.73,817.73 562,863 ; 562,863 672.27,973.27 745,973.27 ; 745,973.27 777.32,1005.58 793.27,1005.58 853,1065.32 853,1096 900,1143 R14.2@900,1146.34 920,1166.34 C8.2@920,1197.12 940,1217.12 940,1310 926.34,1323.66 R13.1@910,1323.66 890,1343.66 890,1373 902,1385 R10.1@910,1385 910,1431 ; 1319.59,256 1403,339.41 ; 1403,339.41 1422.69,359.1
  Bottom2 w10: v1(769,610) v1(795.44,610) 1060,610 1118.81,551.19 1118.81,359.19 v1(1195,283) v1(1195,256) 1195,222 1073.05,100.05 v1(850,100.05) v1(850,123)
VDD_HDMI_5V: C22.2 L4.1 R29.2 R30.2 R31.2 R32.2 R33.1 | length 754.5
  Top1 w10: R29.2@235,875 R33.1@235,840 C22.2@175,840 175,806.34 L4.1@155,786.34 194.34,747 275,747 299,723 299,592.08 336.08,555 R32.2@580,555
VUSB: C3.2 J1.22 J1.23 J1.24 J1.25 J1.26 P1.7 R29.1 U1.7 U1.8 U1.9 U1.10 U1.16 U1.18 U1.19 USB1.A4 USB1.A9 USB1.B4 USB1.B9 | length 3909.2
  Top1 w9: U1.18@1291.02,1330 U1.19@1291.02,1345.75
  Top1 w10: R29.1@275,875 275,930 347,1002 437,1002 v1(473,1038) v1(488,1053) 427,1114 427,1137 364.39,1199.61 ; USB1.B9@294.21,1388.58 247.58,1388.58 ; USB1.A4@294.21,1400.39 259.39,1400.39 247.58,1388.58 ; v1(775,1080) P1.7@775,1190 ; C3.2@1120,1320 v1(1120,1301) 1120,1283 v1(1124,1279) ; U1.10@1168.98,1298.5 1156.5,1298.5 1135,1320 1145,1330 ; U1.9@1168.98,1314.25 1160.75,1314.25 1145,1330 ; U1.8@1168.98,1330 1145,1330 ; U1.7@1168.98,1345.75 1160.75,1345.75 1145,1330 ; U1.16@1291.02,1298.5 1319.5,1298.5 v1(1328,1307) 1328,1320.66 1318.66,1330 ; U1.18@1291.02,1330 1318.66,1330 ; J1.22@1460,595.32 1491.72,595.32 1503.05,606.65 1503.05,628.08 ; J1.23@1460,615 1489.98,615 1503.05,628.08 ; J1.24@1460,634.69 1486.69,634.69 1503.05,651.06 ; J1.25@1460,654.37 1483.37,654.37 1503.05,674.06 ; J1.26@1460,674.06 1503.05,674.06 ; 247.58,1388.58 210,1351 210,1254 252.58,1211.42 ; 252.58,1211.42 264.39,1199.61 USB1.A9@294.21,1199.61 364.39,1199.61 ; 252.58,1211.42 USB1.B4@294.21,1211.42 352.58,1211.42 364.39,1199.61 ; 1318.66,1330 1389.66,1401 1494,1401 1565,1330 1565,736 1503.05,674.06 ; 1503.05,628.08 1503.05,651.06 ; 1503.05,651.06 1503.05,674.06
  Top1 w20: C3.2@1120,1320 1135,1320
  Bottom2 w10: v1(473,1038) v1(488,1053) 498,1063 758,1063 v1(775,1080) v1(775,1106) 811,1106 864,1159 1106,1159 1186,1239 1186,1281 1155,1312 ; v1(1124,1279) 1120,1283 v1(1120,1301) 1131,1312 1155,1312 ; v1(1328,1307) 1323,1312 1155,1312
pads on no net: HDMI?.14 K1.0 U2.2 U2.3 U2.4 U2.18 U2.19 U2.22 U2.25 U2.26 U2.27 U2.28 U2.38 U2.39 U2.40 U2.41 U3.J2 U3.J4 U3.J5 U3.J6 U3.J8 U3.J9 U3.K5 U3.K7 U4.1 USB1.0 USB1.A5 USB1.A8 USB1.B5 USB1.B8

## Polygon pours and split planes (outlines as drawn)
GND on Bottom2 "Bottom2-GND" (solid, remove dead copper, pour order 0): -100,1600 1800,1600 1800,-100 -100,-100
GND on Top1 "Top1-GND" (solid, remove dead copper, pour order 2): -100,1600 1800,1600 1800,-100 -100,-100

## Keep-outs
Keep-Out Layer:
  lines w10: 82.54,-0.04 cw(c82.54,82.5) 0,82.5 0,1427.46 cw(c82.5,1427.46) 82.5,1510 410,1510 410,1260 840,1260 840,1510 1600,1510 ; 82.54,0 1597.5,0 ccw(c1597.5,82.54) 1680.04,82.54 ; 1597.5,1510.04 cw(c1597.5,1427.5) 1680.04,1427.5 ; 1680,82.54 1680,1427.5

## Other copper
Top1:
  text "HDMI-to-MIPI" at 81,682.4 h70 r90
  text "WWW.PENGZHIHUI.COM" at 640,30 h70

## Silkscreen, mask and mechanical layers (free items; w line width, h text height)
Top Overlay:
  text "Key" at 283,921 h70 r90
  text "3.3V" at 1243,154 h20
  text "1.8V" at 1288,154 h20
  text "1.1V" at 1333,154 h20
  text "GND" at 1382,154 h20
Top Solder:
  rectangle: 629.79,19 1389.69,86
  rectangle: 24,671.27 94,1076
Drill Drawing:
  circle w10: c75.62,2627.28 r33.33
  lines w10: 42.29,2293.94 42.29,2310.61 58.96,2327.28 42.29,2343.94 42.29,2360.61 58.96,2360.61 75.62,2343.94 92.29,2360.61 108.96,2360.61 108.96,2343.94 92.29,2327.28 108.96,2310.61 108.96,2293.94 92.29,2293.94 75.62,2310.61 58.96,2293.94 42.29,2293.94 ; 42.29,2443.94 108.96,2443.94 108.96,2510.61 42.29,2510.61 42.29,2443.94 ; 42.29,2810.61 108.96,2810.61 75.62,2743.94 42.29,2810.61 ; 42.29,2910.61 58.96,2910.61 58.96,2893.94 92.29,2893.94 92.29,2910.61 108.96,2910.61 108.96,2943.94 92.29,2943.94 92.29,2960.61 58.96,2960.61 58.96,2943.94 42.29,2943.94 42.29,2910.61 ; 42.29,3060.61 58.96,3060.61 75.62,3043.94 92.29,3060.61 108.96,3060.61 92.29,3077.28 108.96,3093.94 92.29,3093.94 75.62,3110.61 58.96,3093.94 42.29,3093.94 58.96,3077.28 42.29,3060.61 ; 42.29,3193.94 75.62,3210.61 108.96,3193.94 92.29,3227.28 108.96,3260.61 75.62,3243.94 42.29,3260.61 58.96,3227.28 42.29,3193.94
  lines w15: -17.5,2248.94 13280.76,2248.94 ; -17.5,3298.94 13280.76,3298.94 ; 533.38,2098.94 533.38,3448.94 ; 1133.22,2098.94 1133.22,3448.94 ; 2282.88,2098.94 2282.88,3448.94 ; 2788.76,2098.94 2788.76,3448.94 ; 3522.56,2098.94 3522.56,3448.94 ; 4712.21,2098.94 4712.21,3448.94 ; 5302.06,2098.94 5302.06,3448.94 ; 6047.86,2098.94 6047.86,3448.94 ; 7257.5,2098.94 7257.5,3448.94 ; 8111.27,2098.94 8111.27,3448.94 ; 9444.88,2098.94 9444.88,3448.94 ; 10778.48,2098.94 10778.48,3448.94 ; 11878.16,2098.94 11878.16,3448.94 ; -17.5,2098.94 13280.76,2098.94 13280.76,3448.94 -17.5,3448.94 -17.5,2098.94
  text "Symbol" at 72.5,3343.94 h72
  text "Count" at 578.38,3343.94 h72
  text "Hole Size" at 1178.22,3343.94 h72
  text "Plated" at 2327.88,3343.94 h72
  text "Hole Type" at 2833.76,3343.94 h72
  text "Drill Layer Pair" at 3567.56,3343.94 h72
  text "Via/Pad" at 4757.21,3343.94 h72
  text "Pad Shape" at 5347.06,3343.94 h72
  text "Template" at 6092.86,3343.94 h72
  text "Description" at 7302.5,3343.94 h72
  text "Hole Tolerance (+)" at 8156.27,3343.94 h72
  text "Hole Tolerance (-)" at 9489.88,3343.94 h72
  text "Hole Length" at 10823.48,3343.94 h72
  text "Routed Path Length" at 11923.16,3343.94 h72
  text "2" at 578.38,3193.94 h60
  text "0.600mm (23.62mil)" at 1178.22,3193.94 h60
  text "PTH" at 2327.88,3193.94 h60
  text "Slot" at 2833.76,3193.94 h60
  text "Top1 - Bottom2" at 3567.56,3193.94 h60
  text "Pad" at 4757.21,3193.94 h60
  text "Rounded" at 5347.06,3193.94 h60
  text "r160_100h60_120r100" at 6092.86,3193.94 h60
  text "1.200mm (47.24mil)" at 10823.48,3193.94 h60
  text "0.600mm (23.62mil)" at 11923.16,3193.94 h60
  text "2" at 578.38,3043.94 h60
  text "0.600mm (23.62mil)" at 1178.22,3043.94 h60
  text "PTH" at 2327.88,3043.94 h60
  text "Slot" at 2833.76,3043.94 h60
  text "Top1 - Bottom2" at 3567.56,3043.94 h60
  text "Pad" at 4757.21,3043.94 h60
  text "Rounded" at 5347.06,3043.94 h60
  text "r210_100h60_170r100" at 6092.86,3043.94 h60
  text "1.700mm (66.93mil)" at 10823.48,3043.94 h60
  text "1.100mm (43.31mil)" at 11923.16,3043.94 h60
  text "2" at 578.38,2893.94 h60
  text "0.650mm (25.59mil)" at 1178.22,2893.94 h60
  text "PTH" at 2327.88,2893.94 h60
  text "Round" at 2833.76,2893.94 h60
  text "Top1 - Bottom2" at 3567.56,2893.94 h60
  text "Pad" at 4757.21,2893.94 h60
  text "Rounded" at 5347.06,2893.94 h60
  text "c65h65" at 6092.86,2893.94 h60
  text "-" at 10823.48,2893.94 h60
  text "-" at 11923.16,2893.94 h60
  text "2" at 578.38,2743.94 h60
  text "0.711mm (28.00mil)" at 1178.22,2743.94 h60
  text "PTH" at 2327.88,2743.94 h60
  text "Round" at 2833.76,2743.94 h60
  text "Top1 - Bottom2" at 3567.56,2743.94 h60
  text "Pad" at 4757.21,2743.94 h60
  text "Rounded" at 5347.06,2743.94 h60
  text "c0h71" at 6092.86,2743.94 h60
  text "-" at 10823.48,2743.94 h60
  text "-" at 11923.16,2743.94 h60
  text "2" at 578.38,2593.94 h60
  text "2.100mm (82.68mil)" at 1178.22,2593.94 h60
  text "PTH" at 2327.88,2593.94 h60
  text "Slot" at 2833.76,2593.94 h60
  text "Top1 - Bottom2" at 3567.56,2593.94 h60
  text "Pad" at 4757.21,2593.94 h60
  text "Rounded" at 5347.06,2593.94 h60
  text "r150_270h210_90r100" at 6092.86,2593.94 h60
  text "0.900mm (35.43mil)" at 10823.48,2593.94 h60
  text "-1.200mm (-47.24mil)" at 11923.16,2593.94 h60
  text "2" at 578.38,2443.94 h60
  text "2.700mm (106.30mil)" at 1178.22,2443.94 h60
  text "PTH" at 2327.88,2443.94 h60
  text "Slot" at 2833.76,2443.94 h60
  text "Top1 - Bottom2" at 3567.56,2443.94 h60
  text "Pad" at 4757.21,2443.94 h60
  text "Rounded" at 5347.06,2443.94 h60
  text "r150_330h270_90r100" at 6092.86,2443.94 h60
  text "0.900mm (35.43mil)" at 10823.48,2443.94 h60
  text "-1.800mm (-70.87mil)" at 11923.16,2443.94 h60
  text "283" at 578.38,2293.94 h60
  text "0.203mm (8.00mil)" at 1178.22,2293.94 h60
  text "PTH" at 2327.88,2293.94 h60
  text "Round" at 2833.76,2293.94 h60
  text "Top1 - Bottom2" at 3567.56,2293.94 h60
  text "Via" at 4757.21,2293.94 h60
  text "Rounded" at 5347.06,2293.94 h60
  text "v41h20m0mx0" at 6092.86,2293.94 h60
  text "-" at 10823.48,2293.94 h60
  text "-" at 11923.16,2293.94 h60
  text "295 Total" at 578.38,2143.94 h60
  text "Slot definitions :" at 72.5,1998.97 h60
  text "Routed Path Length" at 1105.19,1998.97 h60
  text "= Calculated from tool start centre position to tool end centre position." at 2207.86,1998.97 h60
  text "Hole Length" at 1105.19,1898.99 h60
  text "= Routed Path Length + Tool Size = Slot length as defined in the PCB layout" at 1797.99,1898.99 h60